# Altium PCB Inverter_540VDC.PcbDoc (part 1 of 2)
Units mm, origin at the board's own origin, x right, y up, seen from the top; angles counter-clockwise.
Board outline 400.26 x 240.24 mm, 2 copper layers (Top Layer, Bottom Layer), stack 2.071 mm thick; 193 components, 91 nets, 517 pads, 367 vias.
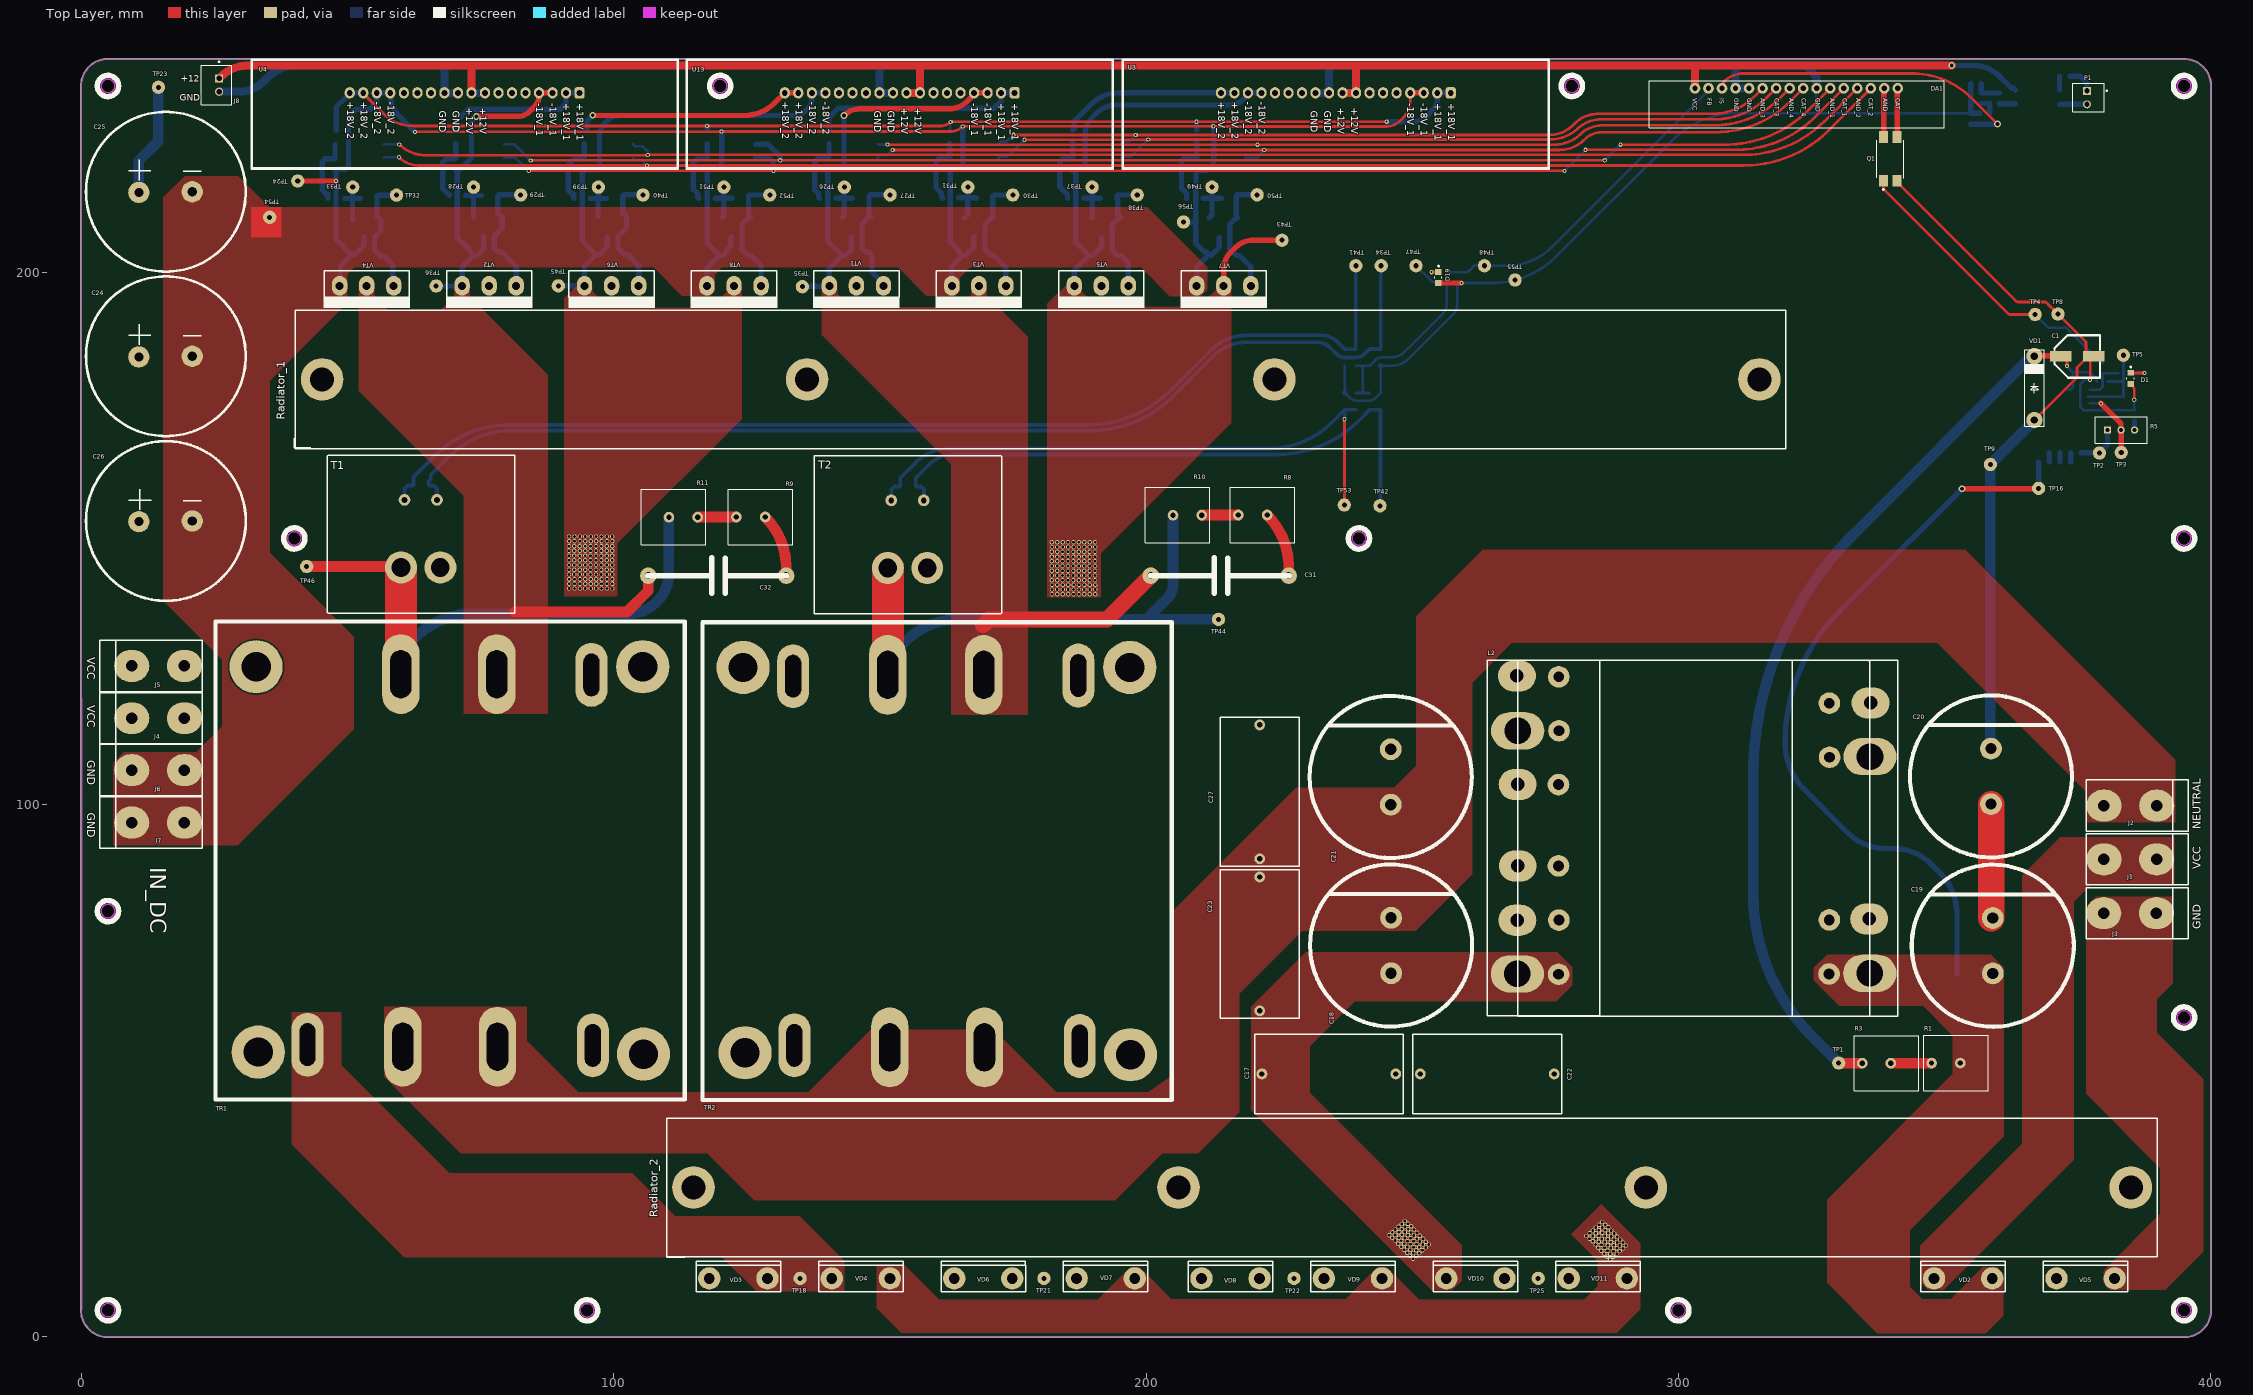
[diagram p0: Top Layer view]
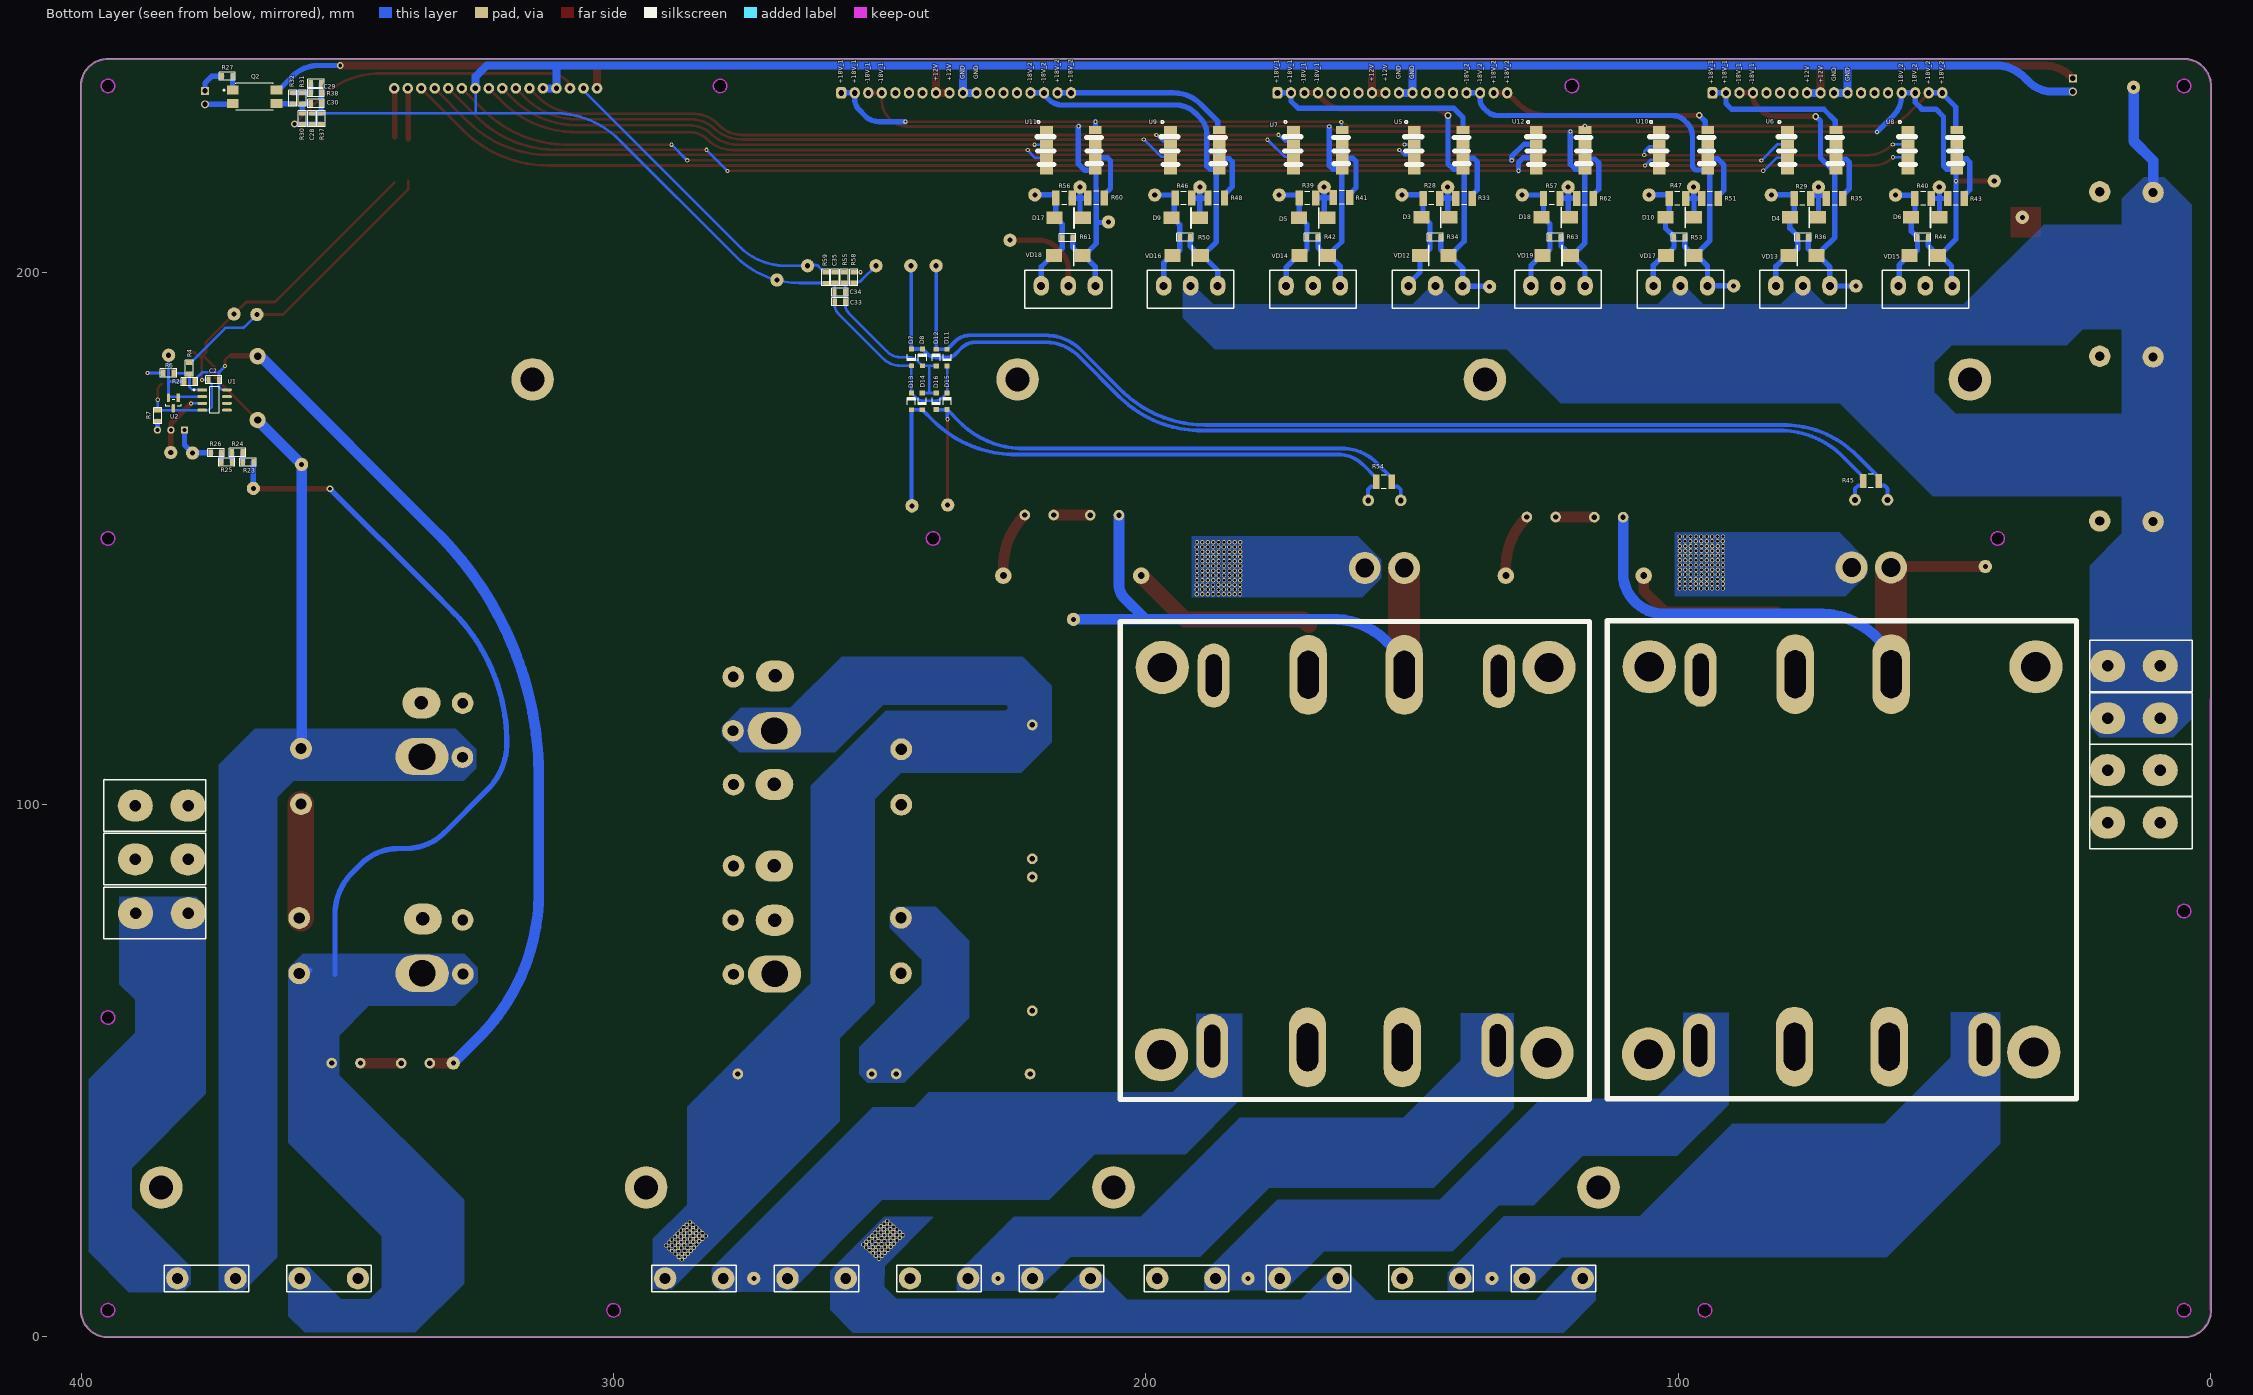
[diagram p1: Bottom Layer view, seen from below]
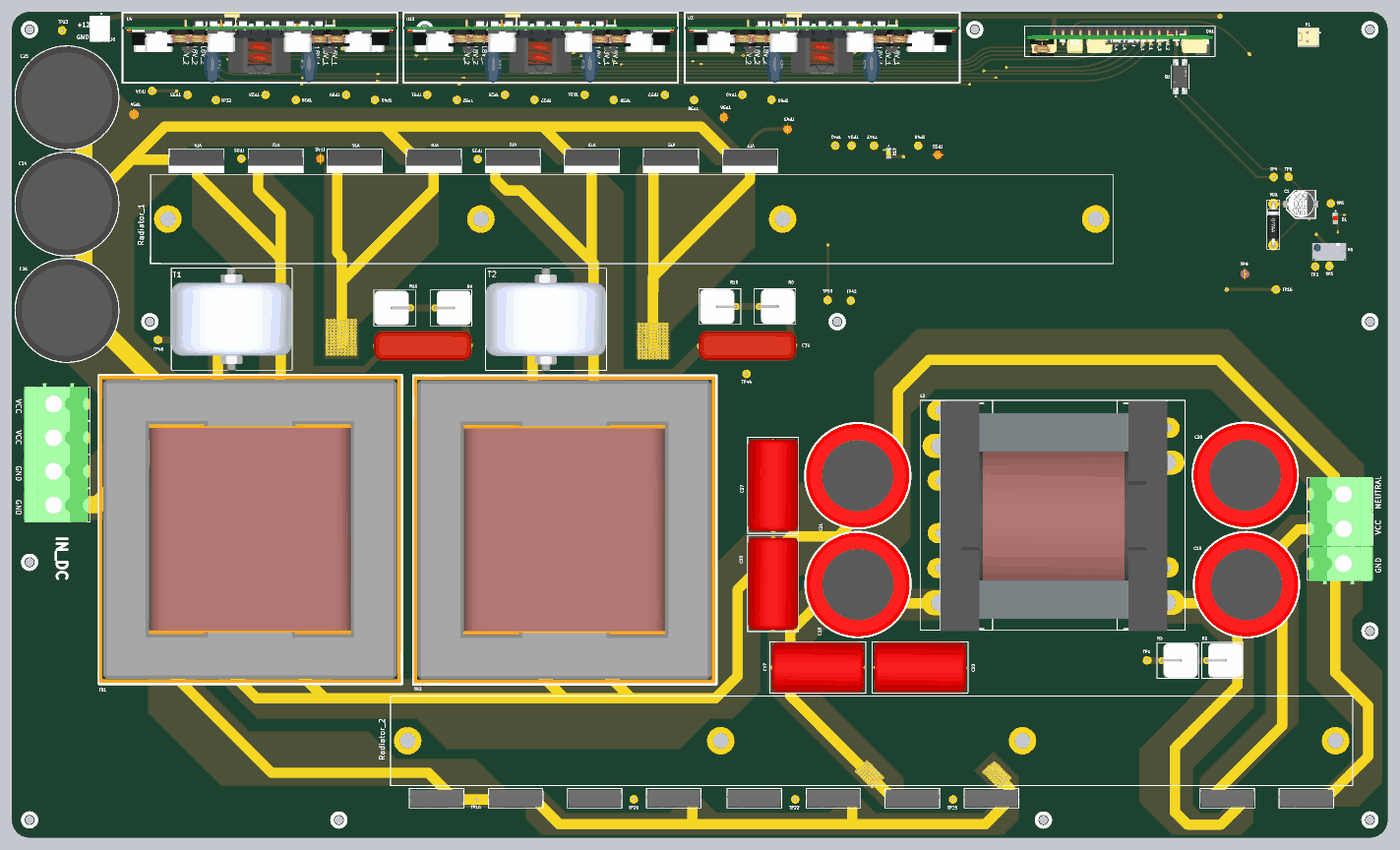
[diagram p3: 3D render of the assembled board from above, using the file's embedded part models]
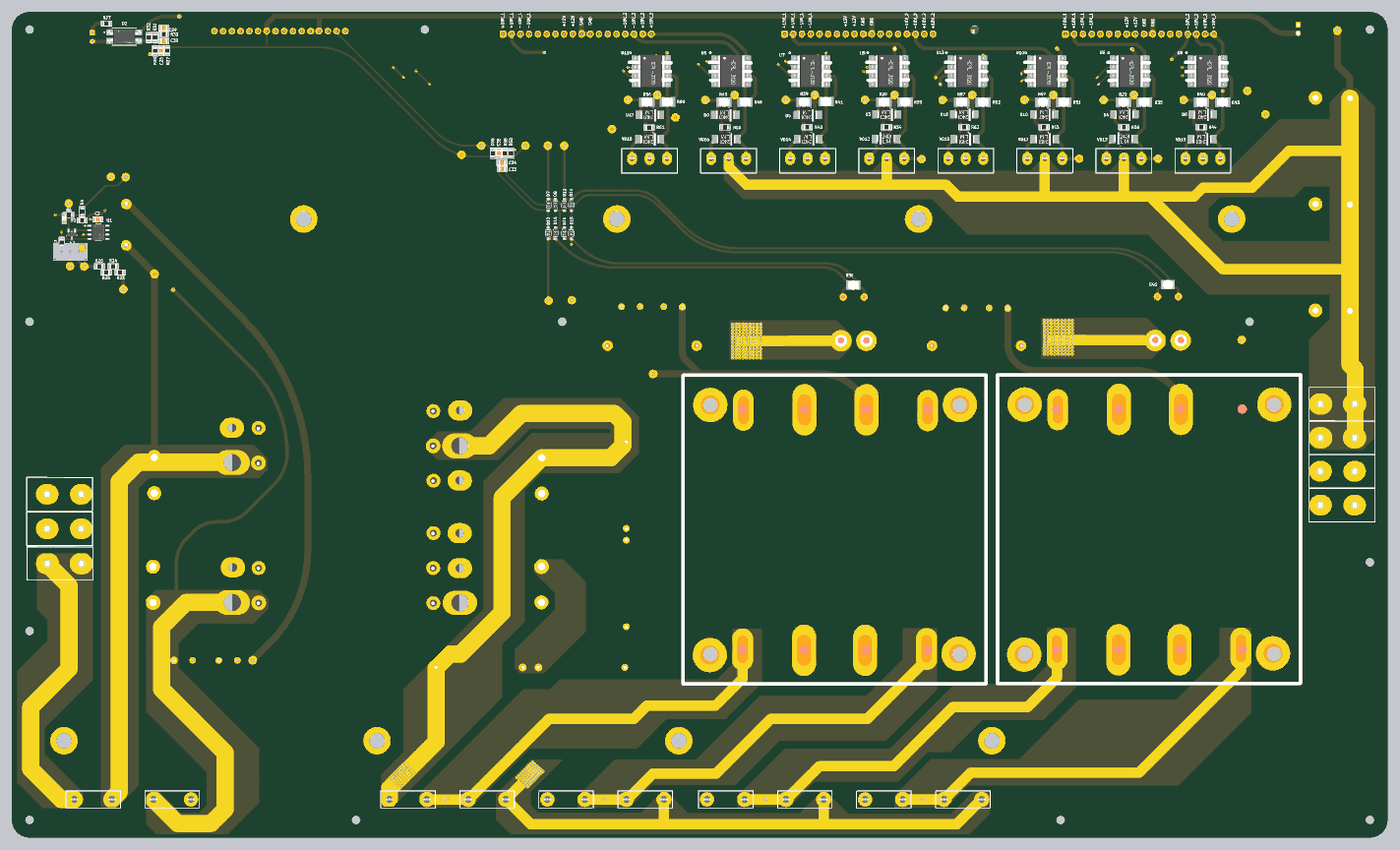
[diagram p4: 3D render of the assembled board from below, using the file's embedded part models]

## Layer stack, top to bottom
Top Solder: solder mask 0.0102, Solder Resist, Dk 3.5
Top Layer: signal copper 0.0356
Dielectric 1: dielectric 2, FR-4, Dk 4.8
Bottom Layer: signal copper 0.0356
Bottom Solder: solder mask 0.0102, Solder Resist, Dk 3.5

## Board outline
-0.125,5.022 ccw(c5.002,5.022) 5.002,-0.105 395,-0.105 ccw(c395,5.022) 400.127,5.022 400.127,5.055 400.127,234.996 400.127,235 ccw(c395,235) 395.028,240.127 395,240.13 5.002,240.127 ccw(c5.002,235) -0.125,235.044 -0.133,235
cut-out: 238.73,150 ccw(c240,150) 240,148.73 ccw(c240,150) 241.27,150 ccw(c240,150) 240,151.27 ccw(c240,150)
cut-out: 38.73,150 ccw(c40,150) 40,148.73 ccw(c40,150) 41.27,150 ccw(c40,150) 40,151.27 ccw(c40,150)
cut-out: 393.73,60 ccw(c395,60) 395,58.73 ccw(c395,60) 396.27,60 ccw(c395,60) 395,61.27 ccw(c395,60)
cut-out: 393.73,150 ccw(c395,150) 395,148.73 ccw(c395,150) 396.27,150 ccw(c395,150) 395,151.27 ccw(c395,150)
cut-out: 393.73,235 ccw(c395,235) 395,233.73 ccw(c395,235) 396.27,235 ccw(c395,235) 395,236.27 ccw(c395,235)
cut-out: 3.732,235 ccw(c5.002,235) 5.002,233.73 ccw(c5.002,235) 6.272,235 ccw(c5.002,235) 5.002,236.27 ccw(c5.002,235)
cut-out: 278.73,235 ccw(c280,235) 280,233.73 ccw(c280,235) 281.27,235 ccw(c280,235) 280,236.27 ccw(c280,235)
cut-out: 118.73,235 ccw(c120,235) 120,233.73 ccw(c120,235) 121.27,235 ccw(c120,235) 120,236.27 ccw(c120,235)
cut-out: 298.73,5 ccw(c300,5) 300,3.73 ccw(c300,5) 301.27,5 ccw(c300,5) 300,6.27 ccw(c300,5)
cut-out: 93.73,5 ccw(c95,5) 95,3.73 ccw(c95,5) 96.27,5 ccw(c95,5) 95,6.27 ccw(c95,5)
cut-out: 3.73,80 ccw(c5,80) 5,78.73 ccw(c5,80) 6.27,80 ccw(c5,80) 5,81.27 ccw(c5,80)
cut-out: 393.73,5.022 ccw(c395,5.022) 395,3.752 ccw(c395,5.022) 396.27,5.022 ccw(c395,5.022) 395,6.292 ccw(c395,5.022)
cut-out: 3.732,5.022 ccw(c5.002,5.022) 5.002,3.752 ccw(c5.002,5.022) 6.272,5.022 ccw(c5.002,5.022) 5.002,6.292 ccw(c5.002,5.022)

## Design rules (kind name [scope] priority, off if disabled: settings)
Clearance [All] p1: gap=0.254 ignorepadtopadclearanceinfootprint=TRUE except(0: THPad-Hole Via-Hole Fill-Hole Poly-Hole Region-Hole Text-Hole; 0.15: SMDPad-SMDPad SMDPad-THPad SMDPad-Via SMDPad-Fill SMDPad-Poly SMDPad-Region SMDPad-Text SMDPad-Hole; 0.2: Arc-Arc Arc-Track Arc-SMDPad Arc-THPad Arc-Via Arc-Fill Arc-Poly Arc-Region Arc-Text Arc-Hole Track-Track Track-SMDPad Track-THPad Track-Via Track-Fill Track-Poly Track-Region Track-Text Track-Hole Poly-Poly)
ComponentClearance [All] p1: gap=-5 collisioncheckmode=3 verticalgap=0.254 showdistances=FALSE
DiffPairsRouting [All] p1: maxlimit=5 minlimit=0.254 mostfreqgap=0.254 toplayer_minwidth=0.381 toplayer_maxwidth=0.381 toplayer_prefwidth=0.381 bottomlayer_minwidth=0.381 bottomlayer_maxwidth=0.381 bottomlayer_prefwidth=0.381 maxuncoupledlength=12.7
Height [All] p1: minheight=0 maxheight=150 prefheight=50
MinimumSolderMaskSliver [All] p1: minsoldermaskwidth=0.15
PlaneClearance [All] p1: clearance=0.7
PlaneConnect [All] p1: planeconnectstyle=Relief reliefexpansion=0.508 reliefentries=4 reliefconductorwidth=0.254 reliefairgap=0.5
PolygonConnect [All] p1: connectstyle=Relief reliefconductorwidth=0.254 reliefentries=4 polygonreliefangle="90 Angle" airgapwidth=0.5
RoutingVias [All] p1: holewidth=0.711 width=1.27 viastyle="Through Hole" minholewidth=0.711 minwidth=1.27 maxholewidth=0.711 maxwidth=1.27
SilkToSilkClearance [All] p1: silktosilkclearance=0.15
SilkToSolderMaskClearance [IsPad] p1: minsilkscreentomaskgap=0.15 clearancetoexposedcopper=TRUE
SolderMaskExpansion [All] p1: expansion=0.102 istentingtop=FALSE
Width [All] p1: maxlimit=7 minlimit=0.254 preferedwidth=2 minimp=50.000000 maximp=50.000000 favimp=50.000000
22 further rules are at their usual default settings.

## Components (designator, comment, footprint, x,y, rotation, side; value= is the part's Value field where it differs from the comment)
C1 "16V 330uF" CAP_SMD_Size_E 375.005,184.245 r180 top
C2 "0.1uF" CAP-0805 375.13,179.82 r180 bottom
C17 "3.3uF_630V" CAP_4.7uF_630V 234.35,49.4 r180 top
C18 "450V_330uF" CAP_450V_330uF 246.05,73.532 r0 top
C19 "500V_470uF" CAP_450V_330uF 359.075,73.493 r0 top locked
C20 "500V_470uF" CAP_450V_330uF 358.725,105.307 r0 top locked
C21 "450V_330uF" CAP_450V_330uF 245.975,105.192 r0 top locked
C22 "3.3uF_630V" CAP_4.7uF_630V 264.1,49.4 r180 top
C23 "3.3uF_630V" CAP_4.7uF_630V 221.35,73.825 r270 top
C24 "1000uF_50V" CAP_100V_1500uF 15.872,184.225 r0 top
C25 "1000uF_50V" CAP_100V_1500uF 15.872,215.125 r0 top
C26 "1000uF_50V" CAP_100V_1500uF 15.88,153.277 r0 top
C27 "3.3uF_630V" CAP_4.7uF_630V 221.35,102.398 r270 top
C28 "CAP-NON-POLAR" CAP-0805 356.675,228.85 r270 bottom
C29 "CAP-NON-POLAR" CAP-0805 355.925,235.475 r0 bottom
C30 "CAP-NON-POLAR" CAP-0805 355.925,231.7 r0 bottom
C31 "1.5uF_630V" CAP_1.5uf_400V 213.85,143 r180 top
C32 "1.5uF_630V" CAP_1.5uf_400V 119.45,143 r180 top locked
C33 "0.1uF" CAP-0805 257.475,194.45 r0 bottom
C34 "1uF" CAP-0805 257.5,196.25 r0 bottom
C35 "CAP-NON-POLAR" CAP-0805 258.425,199.025 r90 bottom
D1 "RED" LED_RED 384.955,180.07 r270 top
D3 "US1G" DO-214AA 143.325,210.325 r0 bottom
D4 "US1G" DO-214AA 74.097,210.325 r0 bottom
D5 "US1G" DO-214AA 166.297,210.225 r0 bottom
D6 "US1G" DO-214AA 51.35,210.325 r0 bottom
D7 "1N4148W-7-F" DIOD-SOD123-2_V 244.05,184 r270 bottom
D8 "1N4148W-7-F" DIOD-SOD123-2_V 242,184 r90 bottom
D9 "US1G" DO-214AA 190.272,210.225 r0 bottom
D10 "US1G" DO-214AA 97.447,210.325 r0 bottom
D11 "1N4148W-7-F" DIOD-SOD123-2_V 237.35,183.975 r270 bottom
D12 "1N4148W-7-F" DIOD-SOD123-2_V 239.4,183.975 r90 bottom
D13 "1N4148W-7-F" DIOD-SOD123-2_V 244.075,175.75 r90 bottom
D14 "1N4148W-7-F" DIOD-SOD123-2_V 242.025,175.75 r270 bottom
D15 "1N4148W-7-F" DIOD-SOD123-2_V 237.35,175.775 r90 bottom
D16 "1N4148W-7-F" DIOD-SOD123-2_V 239.4,175.775 r270 bottom
D17 "US1G" DO-214AA 212.247,210.225 r0 bottom
D18 "US1G" DO-214AA 120.725,210.325 r0 bottom
D19 "151031YS06000" LED_GREEN 254.925,199.025 r270 top
DA1 "PWM_Controller_Half_Bridge_ONLY_TL494" PWM_Controller_Half_Bridge_ONLY_TL494 322.225,233.25 r0 top
J1 "MG_136_HT" Conn_MEIGAN_MG136HT 387.316,89.725 r90 top locked
J2 "MG_136_HT" Conn_MEIGAN_MG136HT 387.323,99.802 r90 top locked
J3 "MG_136_HT" Conn_MEIGAN_MG136HT 387.275,79.6 r90 top locked
J4 "MG_136_HT" Conn_MEIGAN_MG136HT 12,116.225 r270 top locked
J5 "MG_136_HT" Conn_MEIGAN_MG136HT 12,126.05 r270 top locked
J6 "MG_136_HT" Conn_MEIGAN_MG136HT 12,106.475 r270 top locked
J7 "MG_136_HT" Conn_MEIGAN_MG136HT 12,96.625 r270 top locked
J8 "B2B-XH-A" B2B-XH-A 25.35,235.175 r270 top
L2 "ETD59" Drossel 305.525,95.15 r270 top locked
P1 "61900211121" 61900211121 377.075,232.825 r90 top
Q1 "PC817XNNIP0F" FP-PC817XNNIP0F-MFG 339.8,221.3 r90 top
Q2 "PC817XNNIP0F" FP-PC817XNNIP0F-MFG 367.45,232.95 r180 bottom
R1 "18K" RES_5W_VERT 352.975,51.45 r0 top
R2 "18K" RES-0805 379.68,179.47 r180 bottom
R3 "18K" RES_5W_VERT 339.925,51.425 r0 top
R4 "5K" RES-0805 379.705,181.995 r270 bottom
R5 "10K" RES_Adj_3296W_Bourns 383.165,170.37 r270 top
R6 "5K" RES-0805 383.63,181.07 r0 bottom
R7 "1K" RES-0805 385.68,173.07 r90 bottom
R8 "100" RES_5W_VERT 222.75,154.4 r0 top
R9 "100" RES_5W_VERT 128.45,154.025 r0 top
R10 "100" RES_5W_VERT 205.075,154.375 r180 top
R11 "100" RES_5W_VERT 110.375,154 r180 top
R23 "100K" RES-0805 368.68,164.345 r180 bottom
R24 "100K" RES-0805 370.68,166.145 r180 bottom
R25 "100K" RES-0805 372.705,164.345 r180 bottom
R26 "100K" RES-0805 374.705,166.12 r180 bottom
R27 "10K" RES-0805 372.6,236.8 r180 bottom
R28 "10E" RES_SMD_1210_IPC_A 146.4,213.9 r180 bottom
R29 "10E" RES_SMD_1210_IPC_A 76.675,213.875 r180 bottom
R30 "10K" RES-0805 358.475,228.825 r270 bottom
R31 "10K" RES-0805 358.5,232.7 r270 bottom
R32 "10K" RES-0805 360.3,232.675 r90 bottom
R33 "10E" RES_SMD_1210_IPC_A 140.225,213.9 r0 bottom
R34 "4.7K" RES-0805 145.65,206.575 r0 bottom
R35 "10E" RES_SMD_1210_IPC_A 70.65,213.875 r0 bottom
R36 "4.7K" RES-0805 76.575,206.575 r0 bottom
R37 "10K" RES-0805 354.939,228.85 r270 bottom
R38 "10K" RES-0805 355.925,233.7 r180 bottom
R39 "10E" RES_SMD_1210_IPC_A 169.675,213.925 r180 bottom
R40 "10E" RES_SMD_1210_IPC_A 54,213.875 r180 bottom
R41 "10E" RES_SMD_1210_IPC_A 163.249,214.026 r0 bottom
R42 "4.7K" RES-0805 168.75,206.575 r0 bottom
R43 "10E" RES_SMD_1210_IPC_A 47.875,213.875 r0 bottom
R44 "4.7K" RES-0805 54.075,206.575 r0 bottom
R45 "CRCW12100000Z0EA" FP-CRCW1210-e3-IPC_B 63.825,160.8 r0 bottom
R46 "10E" RES_SMD_1210_IPC_A 192.949,213.925 r180 bottom
R47 "10E" RES_SMD_1210_IPC_A 100.174,213.875 r180 bottom
R48 "10E" RES_SMD_1210_IPC_A 186.8,213.925 r0 bottom
R50 "4.7K" RES-0805 192.675,206.55 r0 bottom
R51 "10E" RES_SMD_1210_IPC_A 94.075,213.875 r0 bottom
R53 "4.7K" RES-0805 99.8,206.575 r0 bottom
R54 "CRCW12100000Z0EA" FP-CRCW1210-e3-IPC_B 155.3,160.625 r0 bottom
R55 "2K" RES-0805 256.675,199.025 r90 bottom
R56 "10E" RES_SMD_1210_IPC_A 215.375,213.925 r180 bottom
R57 "10E" RES_SMD_1210_IPC_A 123.775,213.9 r180 bottom
R58 "10K" RES-0805 254.925,199.025 r270 bottom
R59 "30K" RES-0805 260.175,199 r90 bottom
R60 "10E" RES_SMD_1210_IPC_A 209.348,213.939 r0 bottom
R61 "4.7K" RES-0805 214.75,206.5 r0 bottom
R62 "10E" RES_SMD_1210_IPC_A 117.55,213.875 r0 bottom
R63 "4.7K" RES-0805 123.1,206.575 r0 bottom
Radiator_1 "Radiator_26х92х280_ТО-264х12" Radiator_26х92х280_ТО-264х12 180.225,179.875 r180 top
Radiator_2 "Radiator_26х92х280_ТО-264х12" Radiator_26х92х280_ТО-264х12 250,28.075 r0 top locked
T1 "Current_SENS_VERT" Current_SENS_VERT 63.75,150.9 r270 top
T2 "Current_SENS_VERT" Current_SENS_VERT 155.2,150.8 r270 top
TP1 "Test_Point_PCB" Test_Point#1 330.125,51.45 r0 top
TP2 "Test_Point_PCB" Test_Point#1 379.105,166.045 r0 top
TP3 "Test_Point_PCB" Test_Point#1 383.205,166.145 r0 top
TP4 "Test_Point_PCB" Test_Point#1 367.025,192.075 r0 top
TP5 "Test_Point_PCB" Test_Point#1 383.605,184.42 r0 top
TP8 "Test_Point_PCB" Test_Point#1 371.325,192.15 r0 top
TP9 "Test_Point_PCB" Pin_Test_Point(Pink) 358.625,163.9 r0 top
TP16 "Test_Point_PCB" Test_Point#1 367.675,159.4 r90 top
TP18 "Test_Point_PCB" Test_Point#1 135.025,11 r90 top
TP21 "Test_Point_PCB" Test_Point#1 180.825,11 r90 top
TP22 "Test_Point_PCB" Test_Point#1 227.8,11 r90 top
TP23 "" Test_Point#1 14.475,234.75 r90 top
TP24 "Test_Point_PCB" Test_Point#1 40.65,217.15 r90 top
TP25 "Test_Point_PCB" Test_Point#1 273.675,11 r90 top
TP26 "Test_Point_PCB" Test_Point#2 143.325,216.475 r90 top
TP27 "Test_Point_PCB" Test_Point#3 151.925,214.75 r90 top
TP28 "Test_Point_PCB" Test_Point#4 73.675,216.55 r90 top
TP29 "Test_Point_PCB" Test_Point#5 82.531,214.55 r90 top
TP30 "Test_Point_PCB" Test_Point#6 174.975,214.15 r90 top
TP31 "Test_Point_PCB" Test_Point#7 166.525,216.425 r90 top
TP32 "Test_Point_PCB" Test_Point#1 59.2,214.5 r90 top
TP33 "Test_Point_PCB" Test_Point#8 50.975,216.4 r90 top
TP34 "Test_Point_PCB" Test_Point#9 244.175,201.275 r90 top
TP35 "Test_Point_PCB" Test_Point#1 135.45,197.3 r90 top
TP36 "Test_Point_PCB" Test_Point#1 66.65,197.425 r90 top
TP37 "Test_Point_PCB" Test_Point#10 189.875,216.35 r90 top
TP38 "Test_Point_PCB" Test_Point#1 198.35,214.525 r90 top
TP39 "Test_Point_PCB" Test_Point#11 97.125,216.45 r90 top
TP40 "Test_Point_PCB" Test_Point#12 105.51,214.775 r90 top
TP41 "Test_Point_PCB" Test_Point#1 239.425,201.225 r90 top
TP42 "Test_Point_PCB" Test_Point#13 244.05,156.13 r90 top
TP43 "Test_Point_PCB" Pin_Test_Point(Orange) 225.55,206.025 r0 top
TP44 "Test_Point_PCB" Test_Point#1 213.625,134.8 r90 top
TP45 "Test_Point_PCB" Pin_Test_Point(Orange) 89.6,197.45 r0 top
TP46 "Test_Point_PCB" Test_Point#1 42.325,144.725 r90 top
TP47 "Test_Point_PCB" Test_Point#1 250.725,201.225 r90 top
TP48 "" Test_Point#14 263.575,201.025 r90 top
TP49 "Test_Point_PCB" Test_Point#15 212.4,216.625 r90 top
TP50 "Test_Point_PCB" Test_Point#16 220.875,214.05 r90 top
TP51 "Test_Point_PCB" Test_Point#10 120.7,216.35 r90 top
TP52 "Test_Point_PCB" Test_Point#17 129.325,214.5 r90 top
TP53 "Test_Point_PCB" Test_Point#18 237.3,156.525 r90 top
TP54 "Test_Point_PCB" Pin_Test_Point(Orange) 35.375,210.325 r0 top
TP55 "Test_Point_PCB" Pin_Test_Point(Orange) 269.325,198.55 r270 top
TP56 "Test_Point_PCB" Pin_Test_Point(Orange) 207.05,209.45 r0 top
TR1 "EE85AA" "EE84AA Hor"#1 69.15,89.575 r180 top
TR2 "EE85AA" "EE84AA Hor"#2 160.625,89.45 r180 top
U1 "LM358DR2G" FP-751-07-IPC_C 374.97,176.01 r180 bottom
U2 "" TL431_SOT-23-3(A) 382.715,175.443 r270 bottom
U3 "DC-DC" DC-DC_Bridge 195.65,235 r180 top locked
U4 "DC-DC" DC-DC_Bridge 32,235 r180 top locked
U5 "HCPL-3120" HCPL-3120 145.025,222.91 r0 bottom locked
U6 "HCPL-3120" HCPL-3120 74.925,222.91 r0 bottom
U7 "HCPL-3120" HCPL-3120 167.7,222.91 r0 bottom locked
U8 "HCPL-3120" HCPL-3120 52.278,222.91 r0 bottom
U9 "HCPL-3120" HCPL-3120 190.825,222.91 r0 bottom locked
U10 "HCPL-3120" HCPL-3120 99.025,222.91 r0 bottom
U11 "HCPL-3120" HCPL-3120 214.103,222.91 r0 bottom locked
U12 "HCPL-3120" HCPL-3120 122.125,222.91 r0 bottom
U13 "DC-DC" DC-DC_Bridge 113.725,235 r180 top locked
VD1 "13V" DO-017AA 366.9,178.25 r270 top
VD2 "RHRG75120" TO-247-2 353.5,11 r0 top
VD3 "RHRG75120" TO-247-2 123.425,11 r0 top
VD4 "RHRG75120" TO-247-2 146.425,11 r0 top
VD5 "RHRG75120" TO-247-2 376.5,11 r0 top
VD6 "RHRG75120" TO-247-2 169.425,11 r0 top
VD7 "RHRG75120" TO-247-2 192.425,11 r0 top
VD8 "RHRG75120" TO-247-2 215.875,11 r0 top
VD9 "RHRG75120" TO-247-2 238.875,11 r0 top
VD10 "RHRG75120" TO-247-2 261.875,11 r0 top
VD11 "RHRG75120" TO-247-2 284.875,11 r0 top
VD12 "Suppressor" DO-214AA 148.153,203.15 r180 bottom
VD13 "Suppressor" DO-214AA 78.953,203.15 r180 bottom
VD14 "Suppressor" DO-214AA 166.197,203.15 r0 bottom
VD15 "Suppressor" DO-214AA 51.575,203.15 r0 bottom
VD16 "Suppressor" DO-214AA 190.025,203.15 r0 bottom
VD17 "Suppressor" DO-214AA 97.375,203.15 r0 bottom
VD18 "Suppressor" DO-214AA 212.322,203.15 r0 bottom
VD19 "Suppressor" DO-214AA 120.575,203.15 r0 bottom
VT1 "SPW47N60" TO-247-3(Infineon) 145.6,197.2 r180 top
VT2 "SPW47N60" TO-247-3(Infineon) 76.6,197.2 r180 top
VT3 "SPW47N60" TO-247-3(Infineon) 168.6,197.2 r180 top
VT4 "SPW47N60" TO-247-3(Infineon) 53.6,197.2 r180 top
VT5 "SPW47N60" TO-247-3(Infineon) 191.6,197.2 r180 top
VT6 "SPW47N60" TO-247-3(Infineon) 99.6,197.2 r180 top
VT7 "SPW47N60" TO-247-3(Infineon) 214.6,197.2 r180 top
VT8 "SPW47N60" TO-247-3(Infineon) 122.6,197.2 r180 top

## Footprints (in the part's own frame and the unit in brackets; to place one, negate y for a bottom-side part, rotate by r counter-clockwise, add the part's x,y. Pads: shape width x height; smd on the part's side, far side on the other; paste and mask are expansions set on the pad)
61900211121 [mm] "2.54mm Male Locking Header, 2p"
  rect 1.5x1.5 hole 1: 1(1.27,0.3)
  round 1.5 hole 1: 2(-1.27,0.3)
  silkscreen extent -2.71,-3.52 2.71,2.98, body extent -2.54,-2.9 2.54,2.9, height 11.53
B2B-XH-A [mm]
  rect 1.55x1.55 hole 1 paste-2539.97 mask+0: 1(-1.25,0.525)
  round 1.55 hole 1 paste-2539.97 mask+0: 2(1.25,0.525)
  silkscreen extent -4.5,-2.88 3.7,2.88, body extent -3.8,-2.98 3.8,2.98, height 0.25
CAP-0805 [mm]
  rect 0.8x1.25 smd mask+0.015: 1(-1,0) 2(1,0)
  silkscreen extent -1.52,-0.76 1.52,0.76, body extent -1,-0.62 1,0.63, height 0.8
CAP_1.5uf_400V [mm]
  round 3.1 hole 1.3: 1(-12.954,0) 2(12.954,0)
  silkscreen extent -13.08,-3.43 13.08,3.3, body extent -14.25,-4.3 14.25,4.3, height 17.66
CAP_4.7uF_630V [mil]
  round 80 hole 40: 1(-495,0) 2(495,0)
  silkscreen extent -550,-293 550,293, body extent -527,-289 527,289, height 1242
CAP_100V_1500uF [mm]
  round 4 hole 1.7: 1(-5.08,-0.127) 2(4.953,0)
  silkscreen extent -15,-15 15,15, body extent -15,-15 15.1,15.1, height 32.53
CAP_450V_330uF [mm]
  round 4.1 hole 2.1: 1(0,-5.207) 2(0,5.207)
  silkscreen extent -15.22,-15.22 15.23,15.22, body extent -15.1,-15.2 15.15,15.1, height 52.45
CAP_SMD_Size_E [mm]
  rect 4x2 smd: 1(3.175,0) 2(-3.048,0)
  silkscreen extent -4.19,-3.94 4.32,4.06, body extent -4.25,-4 4.25,4, height 10.59
Conn_MEIGAN_MG136HT [mm]
  oval 6x6.6 hole 2.159: 1(0,7.366) 1(0,-2.54)
  silkscreen extent -4.83,-8.51 4.83,10.67, body extent -6,-8.55 5,9.95, height 30.95
Current_SENS_VERT [mm]
  round 6 hole 3.5: 1(6.35,-3.7) 2(6.35,3.7)
  round 2.2 hole 1.1: 3(-6.35,3.048) 4(-6.35,-3.048)
  silkscreen extent -14.73,-17.53 14.99,17.65, body extent -14.75,-17.53 15.06,17.53, height 38.55
DC-DC_Bridge [mm]
  rrect50% 1.905x2.159 hole 1.1: 1(-61.595,1.294)
  oval 1.905x2.159 hole 1.1: 2(-59.055,1.294) 3(-56.515,1.294) 4(-53.975,1.294) 5(-51.435,1.294) 6(-48.895,1.294) 7(-46.355,1.294) 8(-43.815,1.294) 9(-41.275,1.294) 10(-38.735,1.294) 11(-36.195,1.294) 12(-33.655,1.294) 13(-31.115,1.294) 14(-28.575,1.294) 15(-26.035,1.294) 16(-23.495,1.294) 17(-20.955,1.294) 18(-18.415,1.294)
  silkscreen extent -80.01,-4.95 -0.01,15.5, body extent -80,-4.89 0,15.5, height 84
DIOD-SOD123-2_V [mm] "SOD123, 2-Leads, Body 2.7x1.55mm, Height 1.45mm"
  rect 0.9x0.95 smd: 1(1.575,0) 2(-1.575,0)
  silkscreen extent -0.64,-0.82 0.64,0.77, body extent -1.88,-0.8 1.88,0.8, height 1.3
DO-017AA [mm]
  oval 3.1x3 hole 1.4: 1(-6,0) 2(6,0)
  silkscreen extent -7.2,-1.85 7.15,1.83, body extent -6.63,-1.7 6.37,1.7, height 3.4
DO-214AA [mm]
  rect 3x2.4 smd: 1(-0.381,0) 2(4.953,0)
  silkscreen extent 1.27,-1.91 1.27,1.91, body extent -0.53,-1.85 5.07,2.1, height 2.65
Drossel [mil]
  oval 230x280 hole 100: 1(-943,1204) 3(655,1193) 5(-1143,-1411) 7(664,-1408) 9(-340,-1406) 10(263,-1405)
  round 160 hole 80: 1(-941,899) 2(-541,901) 3(662,899) 4(1062,897) 5(-1136,-1102) 6(-737,-1100) 7(663,-1101) 8(1064,-1103) 9(-339,-1104) 10(262,-1104)
  oval 275.59x393.7 hole 196.85: 2(-546,1200) 4(1057,1199) 6(-737,-1406) 8(1061,-1408)
  silkscreen extent -1259,-1630 1376,1405, body extent -1251,-1399 1383,1203, height 2024
"EE84AA Hor"#1 [mm]
  oval 6x12 hole 3 slot 8 at 90 deg: 1(-26.67,-34.798) 5(26.67,34.671) 8(-26.924,34.798)
  oval 7x15 hole 4 slot 9 at 90 deg: 2(-8.89,-34.925) 3(9.144,-34.925) 6(8.763,35.052) 7(-9.017,35.052)
  round 0 all layers, no hole: 4(26.924,-34.671)
  round 10 hole 5.5: 9(-36.449,36.449) 10(35.941,36.068) 11(-36.322,-36.322) 12(36.322,-36.322)
  silkscreen extent -44.2,-44.83 43.94,44.96, body extent -43.93,-44.7 43.93,44.7, height 66.25
"EE84AA Hor"#2 [mm]
  oval 6x12 hole 3 slot 8 at 90 deg: 1(-26.67,-34.798) 4(26.924,-34.671) 5(26.67,34.671) 8(-26.924,34.798)
  oval 7x15 hole 4 slot 9 at 90 deg: 2(-8.89,-34.925) 3(9.144,-34.925) 6(8.763,35.052) 7(-9.017,35.052)
  round 10 hole 5.5: 9(-36.449,36.449) 10(35.941,36.068) 11(-36.322,-36.322) 12(36.322,-36.322)
  silkscreen extent -44.2,-44.83 43.94,44.96, body extent -43.93,-44.7 43.93,44.7, height 66.25
FP-751-07-IPC_C [mm]
  rect 1.874x0.543 smd paste+0 mask+0: 1(-2.316,1.905)
  rrect100% 1.874x0.543 smd paste+0 mask+0: 2(-2.316,0.635) 3(-2.316,-0.635) 4(-2.316,-1.905) 5(2.316,-1.905) 6(2.316,-0.635) 7(2.316,0.635) 8(2.316,1.905)
  silkscreen extent -3.98,-2.45 0.88,2.45, body extent -3,-2.45 3,2.45, height 1.75
FP-CRCW1210-e3-IPC_B [mm]
  rect 1.205x2.706 smd paste+0 mask+0: 1(-1.451,0) 2(1.451,0)
  silkscreen extent -0.47,-1.25 0.47,1.25, body extent -1.6,-1.25 1.6,1.25, height 0.6
FP-PC817XNNIP0F-MFG [mm]
  rect 2.2x1.7 smd paste+0 mask+0: 1(-4.1,1.27) 2(-4.1,-1.27) 3(4.1,-1.27) 4(4.1,1.27)
  silkscreen extent -5.87,-2.54 3.5,2.54, body extent -5,-2.29 5,2.29, height 4.6
HCPL-3120 [mil]
  rect 94.49x60 smd mask+4: 1(180,-150) 2(180,-45) 3(180,55) 4(180,150) 5(-180,150) 6(-180,55) 7(-180,-45) 8(-180,-150)
  silkscreen extent -225,-220 250,105, body extent -191,-191 191,191, height 181
LED_GREEN [mm]
  rect 1.1x1.2 smd paste+0 mask+0: 1(-1.05,0) 2(1.05,0)
  silkscreen extent -2.27,-0.67 0.13,0.67, body extent -1,-0.63 1,0.63, height 0.8
LED_RED [mm]
  rect 1.1x1.2 smd paste+0 mask+0: 1(-1.05,0) 2(1.05,0)
  silkscreen extent -2.27,-0.67 0.13,0.67, body extent -1,-0.63 1,0.63, height 0.8
Pin_Test_Point(Orange) [mm]
  round 2.5 hole 0.95: 1(0,0)
  body extent -1.3,-1.78 1.3,1.78, height 6.93
Pin_Test_Point(Pink) [mm]
  round 2.5 hole 0.95: 1(0,0)
  body extent -1.3,-1.78 1.3,1.78, height 6.93
PWM_Controller_Half_Bridge_ONLY_TL494 [mm]
  round 2 hole 1: 1(-19.1,1.3) 2(-16.56,1.3) 3(-14.02,1.3) 4(-11.48,1.3) 5(-8.94,1.3) 6(-6.4,1.3) 7(-3.86,1.3) 8(-1.32,1.3) 9(1.22,1.3) 10(3.76,1.3) 11(6.3,1.3) 12(8.84,1.3) 13(11.38,1.3) 14(13.92,1.3) 15(16.46,1.3) 16(19,1.3)
  silkscreen extent -27.7,-6.1 27.7,2.7, body extent -27.63,-6.04 27.63,2.58, height 33.13
Radiator_26х92х280_ТО-264х12 [mm]
  round 8 hole 4.5: 1(-135,0) 1(-43.9,0) 1(43.9,0) 1(135,0)
  silkscreen extent -140,-13 140,13, body extent -140,-13 140,13, height 92.05
RES-0805 [mm]
  rect 0.8x1.25 smd mask+0.015: 1(-1,0) 2(1,0)
  silkscreen extent -1.52,-0.76 1.52,0.76, body extent -1,-0.62 1,0.63, height 0.6
RES_5W_VERT [mm]
  round 2 hole 1: 1(-5.4,0) 2(0,0)
  silkscreen extent -6.9,-5.2 5.2,5.2, body extent -5.81,-5 5,5, height 23.4
RES_Adj_3296W_Bourns [mm]
  rect 1.4x1.4 hole 0.75 paste-2539.97 mask+0: 1(0,-2.54)
  round 1.4 hole 0.75 paste-2539.97 mask+0: 2(0,0) 3(0,2.54)
  silkscreen extent -2.49,-4.89 2.47,4.89, body extent -2.59,-4.99 2.57,4.99, height 0.25
RES_SMD_1210_IPC_A [mm]
  rect 1.405x2.806 smd paste+0 mask+0: 1(-1.551,0) 2(1.551,0)
  silkscreen extent -0.47,-1.25 0.47,1.25, body extent -1.6,-1.25 1.6,1.25, height 0.6
Test_Point#1 [mm]
  round 2.5 hole 0.95: 1(0,0)
Test_Point#2 [mm]
  round 2.5 hole 0.95: 1(-0.475,0)
Test_Point#3 [mm]
  round 2.5 hole 0.95: 1(-0.2,0)
Test_Point#4 [mm]
  round 2.5 hole 0.95: 1(-0.55,0)
Test_Point#5 [mm]
  round 2.5 hole 0.95: 1(-0.025,0)
Test_Point#6 [mm]
  round 2.5 hole 0.95: 1(0.375,0)
Test_Point#7 [mm]
  round 2.5 hole 0.95: 1(-0.425,0)
Test_Point#8 [mm]
  round 2.5 hole 0.95: 1(-0.4,0)
Test_Point#9 [mm]
  round 2.5 hole 0.95: 1(-0.05,0)
Test_Point#10 [mm]
  round 2.5 hole 0.95: 1(-0.35,0)
Test_Point#11 [mm]
  round 2.5 hole 0.95: 1(-0.45,0)
Test_Point#12 [mm]
  round 2.5 hole 0.95: 1(-0.25,0)
Test_Point#13 [mm]
  round 2.5 hole 0.95: 1(0,0.1)
Test_Point#14 [mm]
  round 2.5 hole 0.95: 1(0.2,0)
Test_Point#15 [mm]
  round 2.5 hole 0.95: 1(-0.625,0)
Test_Point#16 [mm]
  round 2.5 hole 0.95: 1(0.5,0)
Test_Point#17 [mm]
  round 2.5 hole 0.95: 1(0.025,0)
Test_Point#18 [mm]
  round 2.5 hole 0.95: 1(-0.25,0.05)
TL431_SOT-23-3(A) [mm]
  rect 1.659x0.627 smd paste+0 mask+0: 1(-0.977,0.915)
  rrect100% 1.659x0.627 smd paste+0 mask+0: 2(-0.977,-0.915) 3(0.977,0)
  silkscreen extent -0.65,-1.45 0.65,1.45, body extent -1.2,-1.45 1.2,1.45, height 1.1
TO-247-2 [mm]
  round 4.2 hole 2.032: 1(-5.461,0) 3(5.461,0)
  silkscreen extent -7.94,-2.48 7.94,3.17, body extent -7.9,-2.3 7.9,2.71, height 33.4
TO-247-3(Infineon) [mm]
  oval 2.9x3.7 hole 1.5: 1(-5.08,-0.254) 2(0,-0.254) 3(5.08,-0.254)
  silkscreen extent -8.13,-3.05 8.13,3.94, body extent -8,-3 8,1.91, height 33.4

## Part data
C1: library part CAP_POL_SMD
C2 C17 C22 C23 C27 C33 C34: library part CAP-NON-POLAR
C18 C19 C20 C21: library part CAP_450V_330uF
C24 C25 C26: library part CAP_polar_Hitano
C31 C32: library part 3.3uF_630V
D1: library part LED, "WURTH ELEKTRONIK - 151031YS06000 - LED, Yellow, Through Hole, T-1 (3mm), 30 mA, 2 V, 590 nm", Manufacturer_Name="Wurth Elektronik", Manufacturer_Part_Number=151031YS06000, Mouser Part Number=710-151031YS06000, Datasheet Link=https://katalog.we-online.de/led/datasheet/151031YS06000.pdf, Geometry.Height=5.5mm, Mouser Price/Stock=https://www.mouser.co.uk/ProductDetail/Wurth-Elektronik/151031YS06000?qs=LlUlMxKIyB3xSYYW%252BcuBiQ%3D%3D
D7 D8 D11 D12 D13 D14 D15 D16: library part 1N4148, "Fast Switching Diode, 100 V, 0.15 A, -65 to 150 degC, 2-Pin?SOD123, RoHS, Tape and Reel", If - Forward Current=0.15A, Ir - Reverse Current=1uA, Manufacturer=DiodesIncorporated, Max Surge Current=2A, Maximum Operating Temperature=+150C, Minimum Operating Temperature=-65C, Operating Temperature Range=-65Cto+150C, Package / Case=SOD-123, Package Reference=SOD123-2, Peak Reverse Voltage=100V, Vf - Forward Voltage=1.25V, Brand=DiodesIncorporated, Configuration=Single, Datasheet URL=http://www.farnell.com/datasheets/1915529.pdf, Datasheet Version="Rev. 24-2, 10/2013", Factory Pack Quantity=3000, Height=1.25mm, Length=2.85mm, Manufacturer URL=http://www.diodes.com/, Mounting Style=SMD/SMT, Package URL=http://www.diodes.com/datasheets/ds18004.pdf, Packaging=Reel, Product=SwitchingDiodes, Product Category=Diodes-GeneralPurpose,Power,Switching, Recovery Time=4ns, RoHS=True, Series=1N4148, Type=SwitchingDiode, Unit Weight=0.000353oz, Width=1.7mm
D19: library part LED, "WURTH ELEKTRONIK - 151031YS06000 - LED, Yellow, Through Hole, T-1 (3mm), 30 mA, 2 V, 590 nm", Manufacturer_Name="Wurth Elektronik", Mouser Part Number=710-151031YS06000, Datasheet Link=https://katalog.we-online.de/led/datasheet/151031YS06000.pdf, Geometry.Height=5.5mm, Manufacturer_Part_Number=151031YS06000, Mouser Price/Stock=https://www.mouser.co.uk/ProductDetail/Wurth-Elektronik/151031YS06000?qs=LlUlMxKIyB3xSYYW%252BcuBiQ%3D%3D
J1 J2 J3 J4 J5 J6 J7: library part Connector_MEIGAN_MG136HT
L2: library part DROSSEL, "Drosel", Manufacturer="Wuerth Elektronik", PartNumber=750311457, ComponentLink1Description="Manufacturer URL", ComponentLink1URL=http://www.we-online.com, ComponentLink2Description=Datasheet, ComponentLink2URL=http://katalog.we-online.de/pbs/datasheet/750311457.pdf, PackageReference=EP13, Ui=36V
P1: "WR-WTB THT Male Vertical Locking Header, pitch 2.54mm, 2p", Contact Resistance=20mOhm, Operating Temperature="-40 to +105degC", Rated Current=3A, Withstanding Voltage=1000VAC, Working Voltage=250VAC, ComponentLink1Description=Manufacturer, ComponentLink1URL=http://www.we-online.de, ComponentLink2Description=Datasheet, ComponentLink2URL=https://www.we-online.com/catalog/datasheet/61900211121.pdf, Gender=Male, Mounting Technology=THT, Packaging=Bag, Part Number=61900211121, Pin Number=2, Pitch=2.54mm, Published Date="January 2020", Publisher="Wurth Elektronik", Type=Vertical
Q1 Q2: library part CMP-65434-000005-1, "OPTOISOLATOR 5KV TRANS 4SMD", Case/Package=SMD/SMT, Collector Emitter Saturation Voltage=200mV, Collector Emitter Voltage (VCEO)=80V, Forward Current=50mA, Forward Voltage=1.4V, Isolation Voltage=5kV, Max Operating Temperature=100°C, Max Power Dissipation=200mW, Min Operating Temperature=-30°C, Output Current per Channel=30mA, Package Quantity=2000, Reverse Breakdown Voltage=6V, Collector-emitter Voltage-Max=200mV, Contact Plating=Copper, Fall Time=18000ns, Input Current=50mA, Input Type=DC, Isolation Voltage-Max=5kV, Lead Free="Lead Free", Max Collector Current=50mA, Max Input Current=50mA, Max Output Voltage=80V, Mount="Surface Mount", Number of Channels=1, Number of Elements=1, Number of Pins=4, Output Voltage=80V, Packaging="Tape and Reel", Power Dissipation=200mW, Radiation Hardening=No, Rise Time=18000ns, RoHS Compliant=Yes
R1 R2 R3 R4 R6 R7 R8 R9 R10 R11 R23 R24 R25 R26 R27 R30 R31 R32 R34 R36 R37 R38 R42 R44 R50 R53 R55 R58 R59 R61 R63: library part RES-CONST
R5: library part RES_Adj
R28 R29 R33 R35 R39 R40 R41 R43 R46 R47 R48 R51 R56 R57 R60 R62: library part RES_1210
R45 R54: library part CMP-2005-01987-2, "RES SMD 205K OHM 1% 1/2W 1992", Case Code (Imperial)=1210, Case Code (Metric)=3225, Max Operating Temperature=155°C, Max Power Dissipation=500mW, Min Operating Temperature=-55°C, Package Quantity=1, Resistance=0mR, Temperature Coefficient=0ppm/°C, Voltage Rating=200V, Case/Package=1210, Composition="Thick Film", Contact Plating=Tin, Depth=2.5mm, Features="Automotive AEC-Q200", Height=0.55mm, Length=3.2mm, Military Standard=Not, Mount="Surface Mount", Number of Terminations=2, Packaging="Tape and Reel", Power Rating=500mW, Radiation Hardening=No, REACH SVHC="No SVHC", Termination=SMD/SMT, Weight=0.000564oz, Width=0.098inch
TP1 TP2 TP3 TP4 TP5 TP8 TP9 TP16 TP18 TP21 TP22 TP23 TP24 TP25 TP26 TP27 TP28 TP29 TP30 TP31 TP32 TP33 TP34 TP35 TP36 TP37 TP38 TP39 TP40 TP41 TP42 TP43 TP44 TP45 TP46 TP47 TP48 TP49 TP50 TP51 TP52 TP53 TP54 TP55 TP56: library part TP_PCB?, "Test_Point"
TR1 TR2: library part TR-EE85AA
U1: library part CMP-1310-00291-2, "IC OPAMP GP 2 CIRCUIT 8SOIC", Case/Package=SOIC, Dual Supply Voltage=9V, Input Bias Current=250nA, Input Offset Voltage (Vos)=7mV, Max Dual Supply Voltage=16V, Max Operating Temperature=70°C, Max Supply Voltage=32V, Min Dual Supply Voltage=1.5V, Min Operating Temperature=0°C, Min Supply Voltage=3V, Nominal Supply Current=1.2mA, Operating Supply Current=1.5mA, Output Current=40mA, Package Quantity=2500, Power Supply Rejection Ratio (PSRR)=65dB, Voltage Gain=100dB, Bandwidth=1MHz, Common Mode Rejection Ratio=65dB, Contact Plating=Tin, Gain Bandwidth Product=1MHz, Halogen Free="Halogen Free", Height=1.5mm, Lead Free="Lead Free", Length=5mm, Number of Amplifiers=2, Number of Channels=2, Number of Circuits=2, Number of Elements=2, Number of Pins=8, Operating Supply Voltage=16V, Output Current per Channel=40mA, Packaging="Tape and Reel", Radiation Hardening=No, REACH SVHC="No SVHC", Slew Rate=0.6V/µs, Width=4mm
U2: library part TL431_SOT-23-3, "TL431_SOT-23-3"
U3 U4 U13: library part DC-DC/12-18VDC
VD1: library part ZENER
VD2 VD3 VD4 VD5 VD6 VD7 VD8 VD9 VD10 VD11: library part MUR4060

## Via types
v1: diameter 0.8, hole 0.5, Top Layer to Bottom Layer, 324 vias
v2: diameter 0.8, hole 0.4, Top Layer to Bottom Layer, 37 vias
v3: diameter 1.27, hole 0.711, Top Layer to Bottom Layer, 6 vias

## Nets (pads, with @x,y where several pads share a name; then routed paths per layer and width w, separated by ;. In a path a pad name is that pad's centre, name@x,y a point inside that pad or via, vN(x,y) a via of type N, cw(c..) or ccw(c..) an arc to the next point about the centre after c; other vN are vias at no path point)
+12: DA1.1 J8.1 Q2.4 U3.8 U3.9 U4.8 U4.9 U13.8 U13.9 | length 367.1
  Top Layer w1.5: J8.1@25.875,236.425 26.15,236.7 cw(c31.339,231.513) 31.339,238.85 73.275,238.85 ; U4.9@73.275,233.706 73.275,238.85 ; U13.9@155,233.706 U13.8@157.54,233.706 157.54,238.85 ; U3.9@236.925,233.706 U3.8@239.465,233.706 239.465,238.85 ; DA1.1@303.125,234.55 303.125,238.85 ; v3(351.375,238.85) 303.125,238.85 ; 73.275,238.85 157.54,238.85 ; 157.54,238.85 239.465,238.85 ; 239.465,238.85 303.125,238.85
  Bottom Layer w1: v3(351.375,238.85) 355.449,238.85 cw(c355.449,231.906) 360.359,236.816 360.361,236.814 362.605,234.57 363,234.57 Q2.4@363.35,234.22
  Bottom Layer w1.5: U4.9@73.275,233.706 U4.8@75.815,233.706
+18V_1: U4.1 U4.2 U6.8 | length 28.1
  Bottom Layer w1: U6.8@70.353,226.81 70.536,226.993 70.536,228.486 72.675,230.625 89.975,230.625 91.055,231.705 U4.2@91.055,233.706 U4.1@93.595,233.706
+18V_2: U3.1 U3.2 U4.17 U4.18 U7.8 U8.8 U11.8 U12.8 | length 224.7
  Top Layer w0.5: U4.17@52.955,233.579 56.655,229.879 ccw(c62.416,235.634) 62.416,227.491 v2@117.553,227.491 ; v2(117.553,227.482) 161.409,227.482 161.411,227.482 ccw(c161.411,230.189) 163.274,228.226 v2(163.3,228.25) 163.325,228.275 v2@209.482,228.275 ; v2(209.5,228.275) 209.525,228.3 v2(245.2,228.3)
  Top Layer w1: U4.17@52.955,233.579 U4.17@52.955,233.706
  Bottom Layer w0.5: U7.8@163.128,226.72 163.25,226.842 163.25,228.2 v2(163.3,228.25)
  Bottom Layer w1: U8.8@47.875,226.674 47.875,231.039 50.415,233.579 U4.18@50.415,233.706 U4.17@52.955,233.706 ; U12.8@117.553,226.72 v2(117.553,227.482) ; v2(209.5,228.275) 209.5,226.751 U11.8@209.531,226.72 ; v2(245.2,228.3) 250.161,228.3 250.164,228.3 ccw(c250.164,231.949) 252.744,229.369 253.85,230.475 ccw(c251.788,232.538) 254.705,232.538 254.705,233.579 U3.2@254.705,233.706 U3.1@257.245,233.706
+18V_4: U3.17 U3.18 U9.8 | length 33.8
  Bottom Layer w1: U9.8@186.253,226.72 186.284,226.72 186.546,226.982 186.546,228.396 189.759,231.609 cw(c194.82,226.55) 194.82,233.706 U3.18@214.065,233.706 U3.17@216.605,233.706
+18V_5: U5.8 U13.1 U13.2 | length 40.1
  Bottom Layer w1: U5.8@140.453,226.72 140.453,229.078 142.2,230.825 171.45,230.825 172.758,232.133 172.758,233.684 U13.2@172.78,233.706 U13.1@175.32,233.706
+18V_6: U10.8 U13.17 U13.18 | length 43.6
  Top Layer w1: v3(96.075,229.5) 96.125,229.45 124.448,229.45 124.45,229.45 ccw(c124.45,237.739) 130.313,231.879 U13.18@132.14,233.706 U13.17@134.68,233.706
  Bottom Layer w1: U10.8@94.453,226.72 94.654,226.72 94.916,226.982 94.916,228.341 v3(96.075,229.5)
GND: C28.1 C29.1 C30.1 C33.2 C34.2 C35.1 D7.1 D11.1 D13.1 D15.1 D19.2 DA1.4 DA1.5 DA1.10 J8.2 R37.1 R38.2 R59.1 TP55.1 U3.10 U3.11 U4.10 U4.11 U13.10 U13.11 | length 500.8
  Top Layer w1: D19.2@254.925,197.975 254.938,197.988 259.263,197.988 v2(259.275,198)
  Bottom Layer w0.5: D11.1@237.35,182.4 D15.1@237.35,177.35 237.575,177.15 238.268,176.457 ccw(c239.674,177.865) 239.674,175.875 239.676,175.875 241.92,175.875 241.921,175.875 ccw(c241.921,177.513) 243.08,176.355 243.85,177.125 D13.1@244.075,177.325 D7.1@244.075,182.4 ; D7.1@244.05,182.425 245.942,182.425 245.944,182.425 ccw(c245.944,187.45) 249.498,183.898 257.689,192.089 ccw(c255.798,193.984) 258.475,193.984 C33.2@258.475,194.45 258.45,194.475 258.45,198 C35.1@258.438,198.013 ; C35.1@258.425,198.025 C35.1@258.438,198.013 ; DA1.10@325.935,234.075 325.935,229.935 325.875,229.875 ; R37.1@354.932,229.875 325.875,229.875 ; C35.1@258.438,198.013 260.163,198.013 R59.1@260.175,198 265.111,198 265.113,198 ccw(c265.113,214.808) 277,202.925 298.95,224.875 cw(c311.018,212.81) 311.018,229.875 325.875,229.875
  Bottom Layer w1: 29.621,233.925 29.623,233.925 ; 40.462,238.875 40.465,238.875 ; 67.609,238.875 68.195,238.289 ; D7.1@244.05,182.425 D7.1@244.075,182.4 ; 310.7,238.875 310.745,238.83 ; C29.1@354.925,235.475 354.932,235.468 354.932,229.875 R37.1@354.932,229.863 ; R37.1@354.939,229.85 354.932,229.857 R37.1@354.932,229.863 ; C28.1@356.675,229.85 356.662,229.863 R37.1@354.932,229.863
  Bottom Layer w1.5: J8.2@25.875,233.925 29.621,233.925 ; 29.623,233.925 ccw(c29.623,240.388) 34.194,235.819 34.978,236.603 cw(c40.462,231.119) 40.462,238.875 ; 40.465,238.875 67.609,238.875 149.92,238.875 ; 68.195,238.289 U4.11@68.195,233.706 U4.10@70.735,233.706 ; U13.10@152.46,233.706 U13.11@149.92,233.706 149.92,238.875 ; U3.11@231.845,233.706 U3.10@234.385,233.706 234.385,238.875 ; 310.745,238.83 DA1.4@310.745,234.55 DA1.5@313.285,234.55 ; DA1.10@325.935,234.319 325.935,236.74 323.8,238.875 310.7,238.875 234.385,238.875 ; 149.92,238.875 234.385,238.875
GND_-18V_1: C32.2 R36.1 TP36.1 TR1.2 U4.3 U4.4 U6.5 VD13.2 VT2.3 VT4.2 | length 91.9
  Top Layer w1: v3(74.2,229.29) 81.948,229.29 81.95,229.29 ccw(c81.95,232.405) 84.153,230.203 85.199,231.249 ccw(c83.327,233.122) 85.975,233.122 U4.4@85.975,233.706 U4.3@88.515,233.706
  Top Layer w2: 81.404,136.175 102.5,136.175 106.496,140.171 C32.2@106.496,143
  Bottom Layer w1: TP36.1@66.65,197.425 66.664,197.439 71.505,197.439 VT2.3@71.52,197.454 71.52,200.97 VD13.2@73.7,203.15 ; U6.5@70.353,219.19 70.881,219.19 71.143,219.452 71.244,219.452 73.3,221.508 73.3,228.39 v3(74.2,229.29) ; U6.5@70.6,218.943 70.6,206.55 73,204.15 73,203.85 VD13.2@73.7,203.15 ; R36.1@75.575,206.825 75.575,204.425 74.3,203.15 VD13.2@74,203.15 VD13.2@73.7,203.15
GND_-18V_2: C24.2 C25.2 C26.2 J6.1 J7.1 R42.1 R44.1 R61.1 R63.1 TP24.1 TP54.1 TP56.1 U3.3 U3.4 U4.15 U4.16 U7.5 U8.5 U11.5 U12.5 VD14.1 VD15.1 VD18.1 VD19.1 VT3.3 VT4.3 VT7.3 VT8.3 | length 379.1
  Top Layer w0.5: v2(62.675,226.375) 120.094,226.375 120.169,226.45 v2(120.25,226.45) ; v2(120.25,226.45) 163.279,226.45 163.281,226.45 ccw(c163.281,229.694) v2(165.575,227.4) 165.6,227.425 v2(212.65,227.425) 212.675,227.4 245.106,227.4 245.108,227.4 ccw(c245.108,231.184) 247.784,228.509 248.298,229.023 ccw(c245.098,232.225) 249.625,232.225 U3.4@249.625,233.706
  Top Layer w1: TP24.1@40.65,217.15 40.663,217.137 47.813,217.137 v2(47.825,217.125) ; U3.4@249.625,233.706 U3.3@252.165,233.706
  Bottom Layer w1: U8.5@47.706,219.1 47.951,219.345 49.545,219.345 50.175,219.975 50.175,229.225 51.6,230.65 54.25,230.65 55.495,231.895 U4.16@55.495,233.706 U4.15@58.035,233.706 58.035,233.579 58.035,233.209 ccw(c63.332,233.209) 59.586,229.464 59.589,229.461 v2(62.675,226.375) ; U8.5@48.159,219.115 48.102,219.115 47.825,218.838 47.825,206.219 50.755,203.289 51.358,203.289 52.194,204.125 52.194,204.153 53.075,205.034 R44.1@53.075,206.575 ; VT4.3@48.52,197.454 48.692,197.626 48.692,201.167 50.194,202.669 50.194,202.725 50.894,203.425 VD15.1@51.194,203.425 ; VT8.3@117.52,197.454 117.52,200.776 VD19.1@119.894,203.15 ; v2(120.25,226.45) 120.3,226.4 120.3,220.325 119.337,219.362 117.815,219.362 U12.5@117.553,219.1 117.553,205.491 VD19.1@119.894,203.15 ; R63.1@122.1,206.575 122,206.475 122,204.956 121.194,204.15 121.194,203.85 120.494,203.15 VD19.1@120.194,203.15 VD19.1@119.894,203.15 ; U7.5@163.128,219.1 163.39,219.362 164.912,219.362 165.575,220.025 v2(165.575,227.4) ; U7.5@163.225,218.5 163.225,205.741 164.816,204.15 164.816,203.85 VD14.1@165.516,203.15 ; VT3.3@163.52,197.454 163.52,201.154 VD14.1@165.516,203.15 ; R42.1@167.75,206.575 167.65,206.475 167.65,204.684 166.116,203.15 VD14.1@165.816,203.15 VD14.1@165.516,203.15 ; TP56.1@207.05,209.45 207.163,209.337 209.348,209.337 ; U11.5@209.387,219.1 209.387,215.657 209.348,215.618 209.348,209.337 ; VT7.3@209.52,197.454 209.52,201.029 211.641,203.15 VD18.1@211.941,203.15 ; U11.5@209.531,219.1 209.613,219.182 211.532,219.182 212.75,220.4 212.75,227.325 v2(212.65,227.425) ; R61.1@213.75,206.5 213.75,204.659 212.241,203.15 VD18.1@211.941,203.15 ; 209.348,209.337 209.348,205.402 210.9,203.85 211.241,203.85 VD18.1@211.941,203.15
GND_-18V_4: R50.1 T2.2 TP43.1 U3.15 U3.16 U9.5 VD16.1 VT5.3 VT7.2 | length 91.7
  Top Layer w1: VT7.2@214.6,197.454 214.6,197.854 214.6,200.618 cw(c219.09,200.615) 215.916,203.791 216.712,204.587 cw(c220.181,201.121) 220.181,206.025 TP43.1@225.55,206.025
  Bottom Layer w1: U9.5@186.253,219.1 186.515,219.362 187.989,219.362 188.575,219.948 188.575,225.938 188.575,225.94 cw(c192.944,225.94) 189.855,229.03 190.723,229.898 cw(c194.406,226.219) 194.406,231.425 215.742,231.425 215.745,231.425 ccw(c215.745,234.999) 218.272,232.472 219.145,233.345 U3.16@219.145,233.706 219.525,233.706 U3.15@221.685,233.706 ; VT5.3@186.52,197.454 186.52,200.326 VD16.1@189.344,203.15 ; U9.5@186.541,219.362 186.775,219.128 186.775,205.719 VD16.1@189.344,203.15 ; R50.1@191.675,206.55 191.675,204.881 189.944,203.15 VD16.1@189.344,203.15
  other v1: 182.325,139.511 183.341,139.511 184.357,139.511 185.373,139.511 186.389,139.511 187.405,139.511 188.421,139.511 189.437,139.511 190.453,139.511 182.325,140.4 183.341,140.4 184.357,140.4 185.373,140.4 186.389,140.4 187.405,140.4 188.421,140.4 189.437,140.4 190.453,140.4 182.331,141.275 183.347,141.275 184.363,141.275 185.379,141.275 186.395,141.275 187.411,141.275 188.427,141.275 189.443,141.275 190.459,141.275 182.293,142.147 183.309,142.147 184.325,142.147 185.341,142.147 186.357,142.147 187.373,142.147 188.389,142.147 189.405,142.147 190.421,142.147 182.293,143.036 183.309,143.036 184.325,143.036 185.341,143.036 186.357,143.036 187.373,143.036 188.389,143.036 189.405,143.036 190.421,143.036 182.293,143.925 183.309,143.925 184.325,143.925 185.341,143.925 186.357,143.925 187.373,143.925 188.389,143.925 189.405,143.925 190.421,143.925 182.293,144.814 183.309,144.814 184.325,144.814 185.341,144.814 186.357,144.814 187.373,144.814 188.389,144.814 189.405,144.814 190.421,144.814 182.293,145.703 183.309,145.703 184.325,145.703 185.341,145.703 186.357,145.703 187.373,145.703 188.389,145.703 189.405,145.703 190.421,145.703 182.293,146.592 183.309,146.592 184.325,146.592 185.341,146.592 186.357,146.592 187.373,146.592 188.389,146.592 189.405,146.592 190.421,146.592 182.293,147.481 183.309,147.481 184.325,147.481 185.341,147.481 186.357,147.481 187.373,147.481 188.389,147.481 189.405,147.481 190.421,147.481 182.331,148.387 183.347,148.387 184.363,148.387 185.379,148.387 186.395,148.387 187.411,148.387 188.427,148.387 189.443,148.387 190.459,148.387 182.306,149.287 183.322,149.287 184.338,149.287 185.354,149.287 186.37,149.287 187.386,149.287 188.402,149.287 189.418,149.287 190.434,149.287
GND_-18V_5: C31.2 R34.1 TP35.1 TR2.2 U5.5 U13.3 U13.4 VD12.2 VT1.3 VT3.2 | length 109.6
  Top Layer w1: v3(143.254,229.454) cw(c146.262,226.447) 146.262,230.7 146.264,230.7 162.872,230.7 162.875,230.7 ccw(c162.875,235.771) 166.46,232.185 167.7,233.425 U13.4@167.7,233.706 U13.3@170.24,233.706
  Top Layer w3: 169.4,133.7 170.45,134.75 192.646,134.75 C31.2@200.896,143
  Bottom Layer w1: TP35.1@135.45,197.3 135.527,197.377 140.443,197.377 VT1.3@140.52,197.454 140.52,200.77 VD12.2@142.9,203.15 ; U5.5@140.225,219.012 140.225,205.825 VD12.2@142.9,203.15 ; U5.5@140.453,219.1 140.715,219.362 142.237,219.362 143.254,220.379 v3(143.254,229.454) ; R34.1@144.65,206.575 144.65,204.3 143.5,203.15 VD12.2@143.2,203.15 VD12.2@142.9,203.15
GND_-18V_6: R53.1 T1.2 TP45.1 U10.5 U13.15 U13.16 VD17.1 VT6.3 VT8.2 | length 89.3
  Bottom Layer w1: TP45.1@89.6,197.45 89.602,197.452 94.518,197.452 VT6.3@94.52,197.454 94.52,201.176 VD17.1@96.694,203.35 ; U10.5@94.075,218.928 94.075,205.969 VD17.1@96.694,203.35 ; U10.5@94.453,219.1 94.575,219.222 96.764,219.222 97.35,219.808 97.35,225.638 97.35,225.64 cw(c100.693,225.64) 98.33,228.005 98.887,228.562 cw(c101.03,226.419) 101.03,229.45 133.853,229.45 ccw(c133.853,232.52) 136.024,230.349 136.654,230.979 ccw(c135.287,232.346) 137.22,232.346 U13.16@137.22,233.706 U13.15@139.76,233.706 ; R53.1@98.8,206.575 98.8,204.856 97.994,204.05 97.994,203.85 97.494,203.35 VD17.1@96.694,203.35
  other v1: 91.625,140.586 92.641,140.586 93.657,140.586 94.673,140.586 95.689,140.586 96.705,140.586 97.721,140.586 98.737,140.586 99.753,140.586 91.625,141.475 92.641,141.475 93.657,141.475 94.673,141.475 95.689,141.475 96.705,141.475 97.721,141.475 98.737,141.475 99.753,141.475 91.631,142.35 92.647,142.35 93.663,142.35 94.679,142.35 95.695,142.35 96.711,142.35 97.727,142.35 98.743,142.35 99.759,142.35 91.593,143.222 92.609,143.222 93.625,143.222 94.641,143.222 95.657,143.222 96.673,143.222 97.689,143.222 98.705,143.222 99.721,143.222 91.593,144.111 92.609,144.111 93.625,144.111 94.641,144.111 95.657,144.111 96.673,144.111 97.689,144.111 98.705,144.111 99.721,144.111 91.593,145 92.609,145 93.625,145 94.641,145 95.657,145 96.673,145 97.689,145 98.705,145 99.721,145 91.593,145.889 92.609,145.889 93.625,145.889 94.641,145.889 95.657,145.889 96.673,145.889 97.689,145.889 98.705,145.889 99.721,145.889 91.593,146.778 92.609,146.778 93.625,146.778 94.641,146.778 95.657,146.778 96.673,146.778 97.689,146.778 98.705,146.778 99.721,146.778 91.593,147.667 92.609,147.667 93.625,147.667 94.641,147.667 95.657,147.667 96.673,147.667 97.689,147.667 98.705,147.667 99.721,147.667 91.593,148.556 92.609,148.556 93.625,148.556 94.641,148.556 95.657,148.556 96.673,148.556 97.689,148.556 98.705,148.556 99.721,148.556 91.631,149.462 92.647,149.462 93.663,149.462 94.679,149.462 95.695,149.462 96.711,149.462 97.727,149.462 98.743,149.462 99.759,149.462 91.606,150.362 92.622,150.362 93.638,150.362 94.654,150.362 95.67,150.362 96.686,150.362 97.702,150.362 98.718,150.362 99.734,150.362